# Altium PCB imprimir.PcbDoc (part 4 of 4)
Units mm, origin at the board's own origin, x right, y up, seen from the top; angles counter-clockwise.
Board outline 196.72 x 221.49 mm, 2 copper layers (Top Layer, Bottom Layer); 172 components, 0 nets, 904 pads, 232 vias.
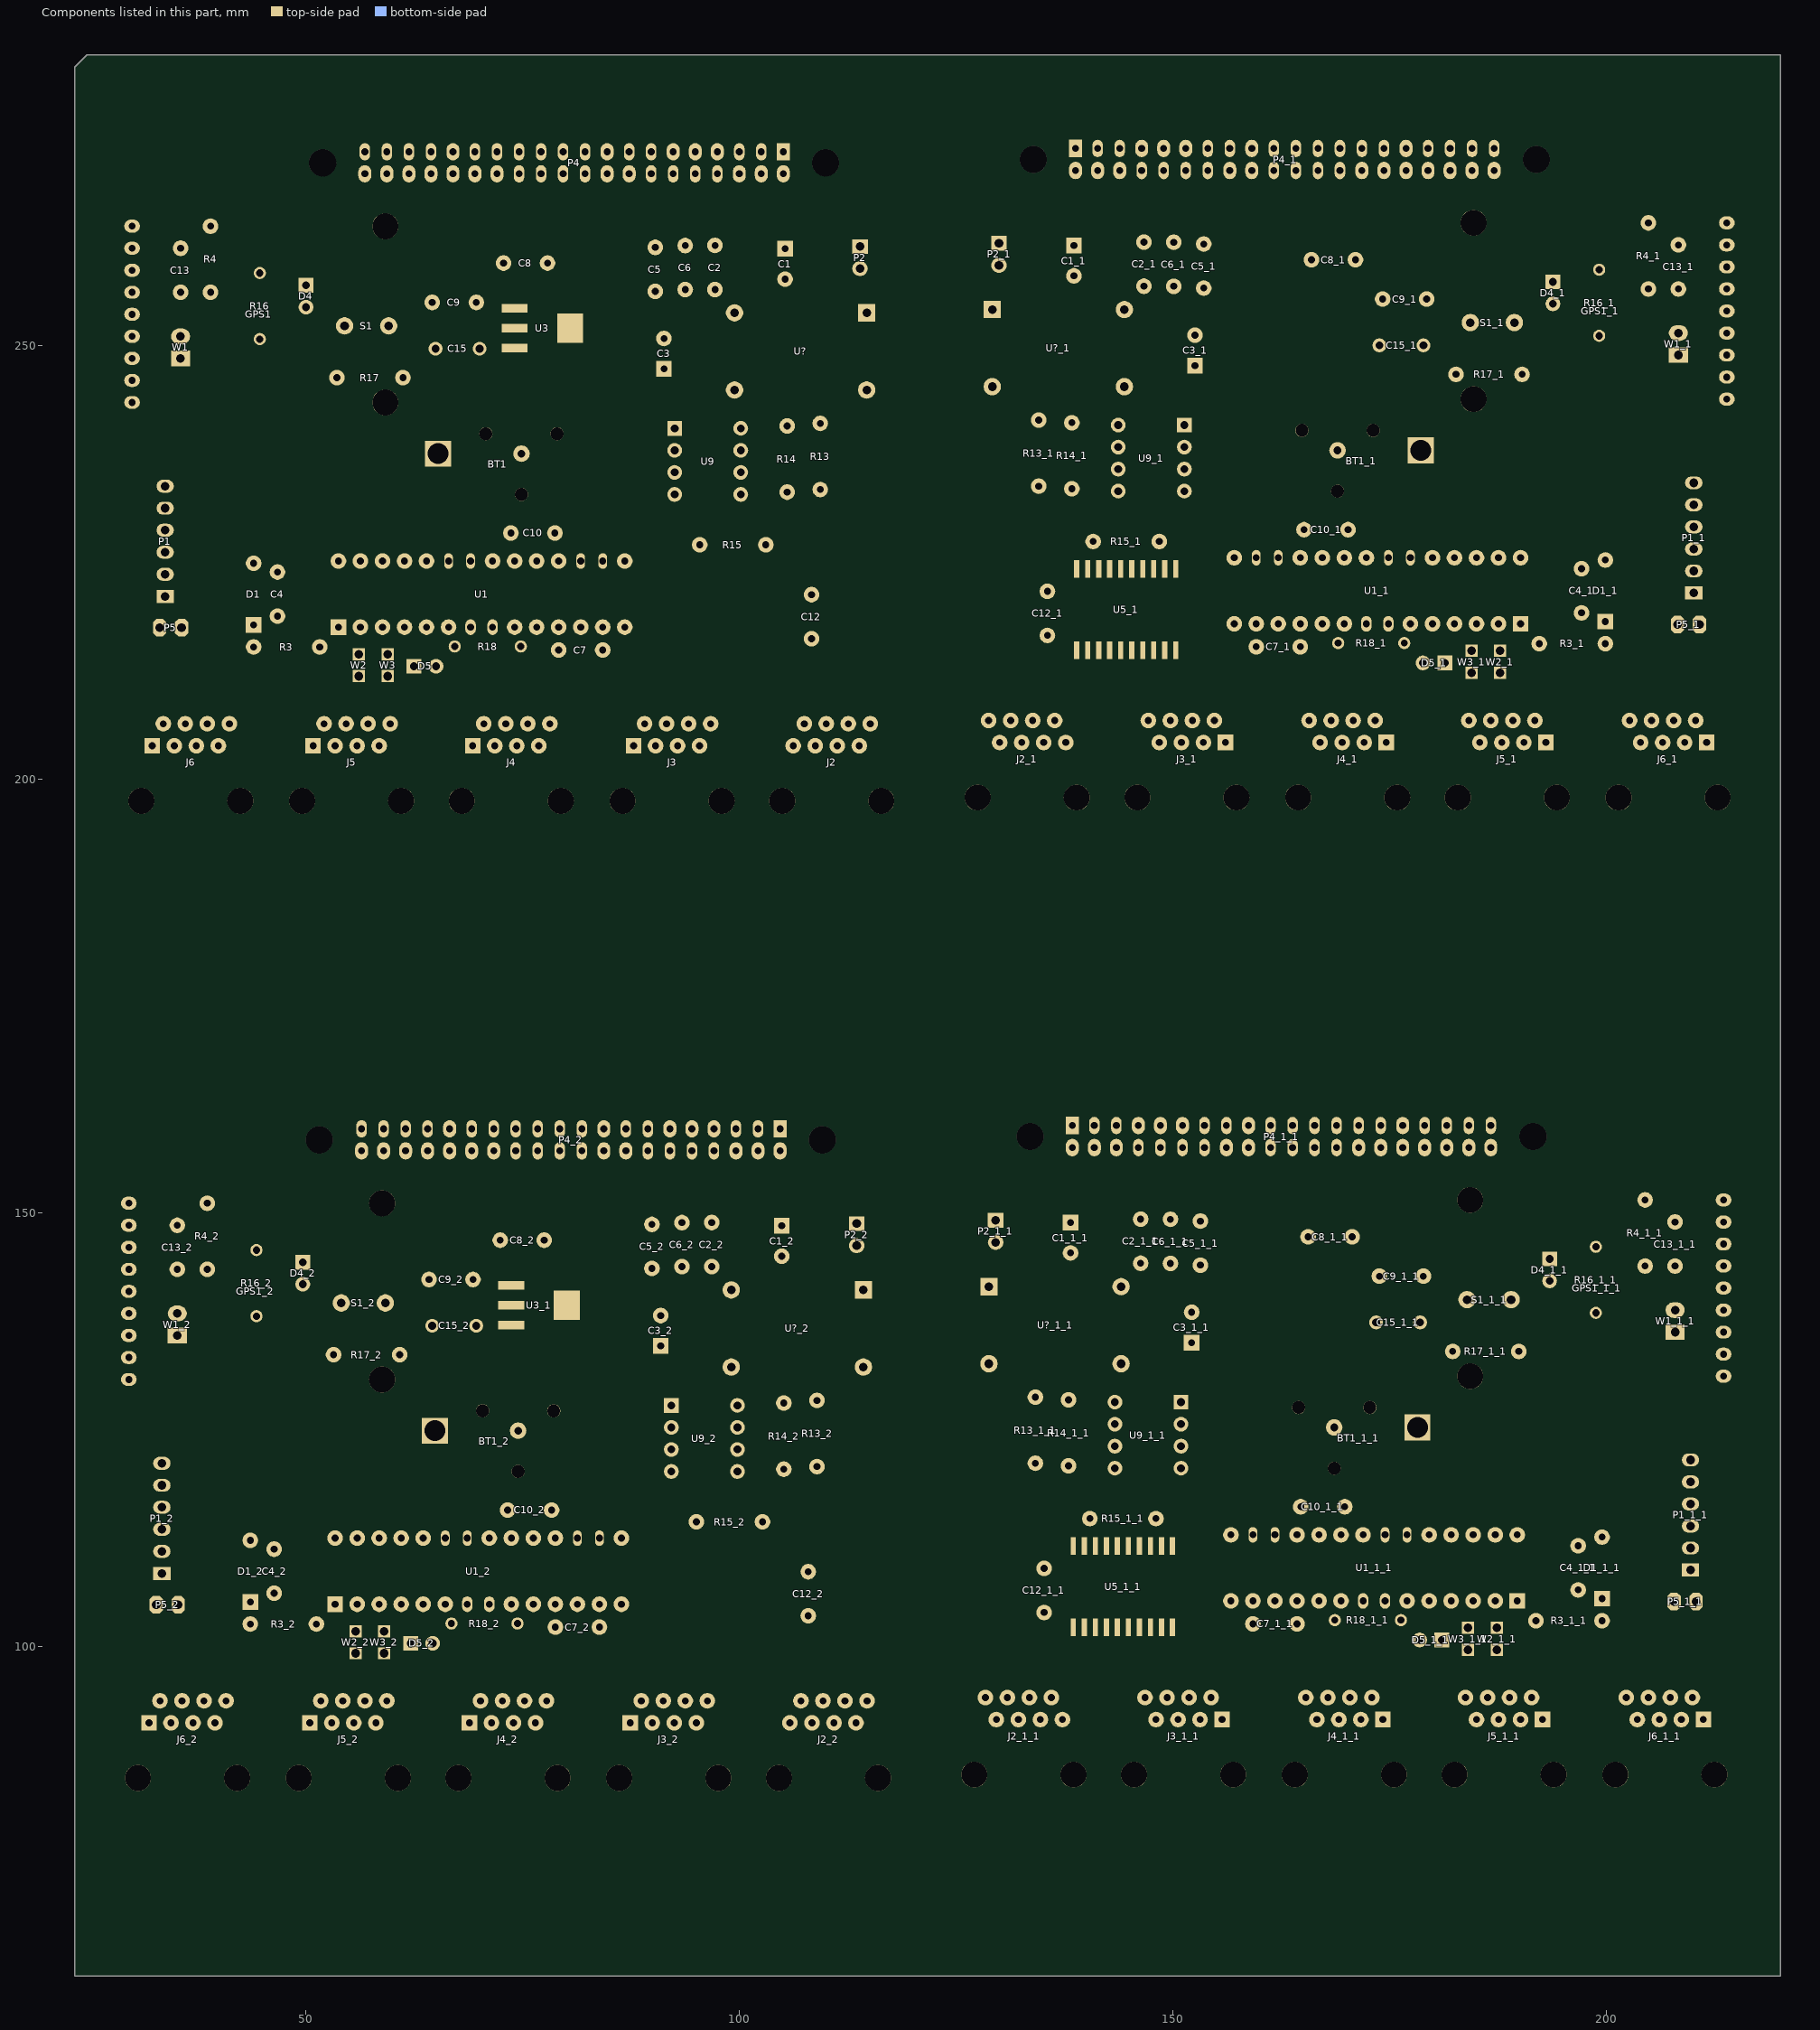
[diagram p4: the components of this part, seen from the top]

## Via types
v1: diameter 1.6, hole 0.6, Top Layer to Bottom Layer, 232 vias

## Nets (pads, with @x,y where several pads share a name; then routed paths per layer and width w, separated by ;. In a path a pad name is that pad's centre, name@x,y a point inside that pad or via, vN(x,y) a via of type N, cw(c..) or ccw(c..) an arc to the next point about the centre after c; other vN are vias at no path point) (continued)
copper on no net: (continued)
  Top Layer w0.025: 105.41,220.167 105.461,220.167
  Top Layer w0.254: 23.368,61.976 23.368,282.067 24.765,283.464 220.091,283.464 220.091,61.976 23.368,61.976
  Top Layer w0.5: 69.088,162.433 70.429,161.092 70.429,158.398 69.14,157.109 ; 69.469,275.082 70.81,273.741 70.81,271.047 69.521,269.758 ; 76.76,159.649 75.47,158.359 75.47,155.726 75.068,155.324 75.068,154.089 78.675,150.483 v1(84.72,150.483) ; 77.141,272.298 75.851,271.008 75.851,268.375 75.449,267.973 75.449,266.738 79.056,263.132 v1(85.101,263.132) ; 79.3,159.649 78.05,158.399 78.05,155.705 78.624,155.131 78.624,154.115 80.529,152.21 v1(82.739,152.21) ; 79.681,272.298 78.431,271.048 78.431,268.354 79.005,267.78 79.005,266.764 80.91,264.859 v1(83.12,264.859) ; v1@80.55,154.75 80.55,158.359 81.84,159.649 ; v1@80.931,267.399 80.931,271.008 82.221,272.298 ; 92,159.649 93.254,158.394 v1(93.254,154.75) ; 92.381,272.298 93.635,271.043 v1(93.635,267.399) ; 94.54,159.649 95.83,158.359 95.83,155.705 ; 94.921,272.298 96.211,271.008 96.211,268.354 ; 173.217,103.596 173.217,109.057 ; 173.598,216.245 173.598,221.706
  Top Layer w0.6: 35.814,105.156 v1@35.814,121.793 ; 36.195,217.805 v1@36.195,234.442 ; v1@38.481,115.57 v1(38.735,115.57) 38.735,102.87 29.718,93.853 29.718,90.551 31.623,88.646 v1(45.593,88.646) ; v1@38.862,228.219 v1(39.116,228.219) 39.116,215.519 30.099,206.502 30.099,203.2 32.004,201.295 v1(45.974,201.295) ; v1(38.989,121.793) 37.211,120.015 37.211,103.886 28.718,95.393 28.718,90.137 31.709,87.146 62.508,87.146 v1(64.135,88.773) ; v1(39.37,234.442) 37.592,232.664 37.592,216.535 29.099,208.042 29.099,202.786 32.09,199.795 62.889,199.795 v1(64.516,201.422) ; v1(45.466,92.837) 45.466,95.289 46.189,96.012 61.976,96.012 64.135,93.853 v1(64.135,92.583) 66.929,95.377 81.637,95.377 82.677,94.337 v1@82.677,93.345 ; v1(45.847,205.486) 45.847,207.938 46.57,208.661 62.357,208.661 64.516,206.502 v1(64.516,205.232) 67.31,208.026 82.018,208.026 83.058,206.986 v1@83.058,205.994 ; 52.387,112.459 53.392,112.459 ; 52.768,225.108 53.773,225.108 ; v1@53.213,148.717 53.213,148.971 56.44,152.198 56.44,157.109 ; v1@53.594,261.366 53.594,261.62 56.821,264.847 56.821,269.758 ; 54.102,139.573 54.102,145.034 v1(57.531,148.463) ; 54.483,252.222 54.483,257.683 v1(57.912,261.112) ; 56.44,159.649 56.44,160.707 58.166,162.433 73.481,162.433 v1(74.306,161.608) 75.131,162.433 93.472,162.433 94.54,161.365 94.54,159.649 ; 56.821,272.298 56.821,273.356 58.547,275.082 73.862,275.082 v1(74.687,274.257) 75.512,275.082 93.853,275.082 94.921,274.014 94.921,272.298 ; 58.98,157.109 59.055,157.034 v1(59.055,154.305) ; 59.361,269.758 59.436,269.683 v1(59.436,266.954) ; v1(59.989,120.363) 59.989,127.426 63.5,130.937 80.645,130.937 84.107,127.475 v1(88.818,127.475) ; v1(60.37,233.012) 60.37,240.075 63.881,243.586 81.026,243.586 84.488,240.124 v1(89.199,240.124) ; 61.52,157.109 61.52,155.904 65.278,152.146 v1(65.278,148.336) v1@65.278,147.828 ; 61.901,269.758 61.901,268.553 65.659,264.795 v1(65.659,260.985) v1@65.659,260.477 ; 64.06,155.65 64.06,157.109 ; 64.441,268.299 64.441,269.758 ; v1(65.102,120.956) 65.102,116.793 67.351,114.544 67.351,111.643 72.195,106.799 89.908,106.799 v1(89.789,106.68) ; v1(65.483,233.605) 65.483,229.442 67.732,227.193 67.732,224.292 72.576,219.448 90.289,219.448 v1(90.17,219.329) ; v1(66.802,99.187) 66.802,102.616 ; v1(67.183,211.836) 67.183,215.265 ; v1(68.879,115.791) 70.944,117.856 79.375,117.856 82.931,114.3 v1(89.789,114.3) ; 69.14,157.109 72.429,153.82 72.429,146.811 69.294,143.676 69.294,142.278 ; v1(69.26,228.44) 71.325,230.505 79.756,230.505 83.312,226.949 v1(90.17,226.949) ; 69.521,269.758 72.81,266.469 72.81,259.46 69.675,256.325 69.675,254.927 ; 69.668,136.944 69.294,137.319 69.294,142.278 ; 70.049,249.593 69.675,249.968 69.675,254.927 ; 73.712,137.018 76.747,133.983 83.566,133.983 ; 73.712,139.318 80.112,139.318 80.518,139.724 80.518,143.801 77.509,146.811 ; 73.712,141.618 69.954,141.618 69.294,142.278 ; 74.093,249.667 77.128,246.632 83.947,246.632 ; 74.093,251.967 80.493,251.967 80.899,252.373 80.899,256.45 77.89,259.46 ; 74.093,254.267 70.335,254.267 69.675,254.927 ; v1(76.327,102.616) 76.327,99.695 73.66,97.028 45.72,97.028 43.053,94.361 43.053,91.948 44.323,90.678 46.482,90.678 48.768,88.392 60.96,88.392 62.865,90.297 64.897,90.297 67.183,88.011 81.026,88.011 v1(82.677,89.662) ; v1(76.708,215.265) 76.708,212.344 74.041,209.677 46.101,209.677 43.434,207.01 43.434,204.597 44.704,203.327 46.863,203.327 49.149,201.041 61.341,201.041 63.246,202.946 65.278,202.946 67.564,200.66 81.407,200.66 v1(83.058,202.311) ; 78.919,102.197 78.792,102.197 82.945,98.044 104.013,98.044 107.478,101.509 107.478,103.937 ; 79.3,214.846 79.173,214.846 83.326,210.693 104.394,210.693 107.859,214.158 107.859,216.586 ; v1(82.677,92.71) v1@82.677,93.345 ; v1(82.931,116.586) 89.994,116.586 v1(90.088,116.68) ; v1(83.058,205.359) v1@83.058,205.994 ; v1(83.312,229.235) 90.375,229.235 v1(90.469,229.329) ; 89.46,157.109 89.21,157.109 89.21,153.487 90.551,152.146 94.234,152.146 95.377,153.289 99.62,153.289 99.62,157.109 ; 89.841,269.758 89.591,269.758 89.591,266.136 90.932,264.795 94.615,264.795 95.758,265.938 100.001,265.938 100.001,269.758 ; 93.385,148.836 90.13,148.836 89.923,148.629 85.598,144.304 85.598,136.015 83.566,133.983 ; 93.766,261.485 90.511,261.485 90.304,261.278 85.979,256.953 85.979,248.664 83.947,246.632 ; v1(100.838,80.391) 101.092,80.645 v1(101.092,88.773) ; v1(101.092,91.44) 105.156,87.376 115.697,87.376 116.84,88.519 116.84,117.856 106.668,128.028 105.134,128.028 ; v1(101.092,93.853) v1@101.346,94.107 ; v1(101.219,193.04) 101.473,193.294 v1(101.473,201.422) ; v1(101.473,204.089) 105.537,200.025 116.078,200.025 117.221,201.168 117.221,230.505 107.049,240.677 105.515,240.677 ; v1(101.473,206.502) v1@101.727,206.756 ; v1(101.854,154.051) 104.7,156.897 104.7,157.109 ; v1@102.108,154.305 114.675,154.305 117.094,151.886 117.094,129.921 115.503,128.33 108.959,128.33 ; v1(102.235,127.889) 102.235,129.54 101.346,130.429 90.297,130.429 86.743,133.983 83.566,133.983 ; v1(102.235,266.7) 105.081,269.546 105.081,269.758 ; v1@102.489,266.954 115.056,266.954 117.475,264.535 117.475,242.57 115.884,240.979 109.34,240.979 ; v1(102.616,240.538) 102.616,242.189 101.727,243.078 90.678,243.078 87.124,246.632 83.947,246.632 ; v1@104.542,122.936 v1(105.156,122.936) 106.733,122.936 108.959,120.71 ; v1@104.923,235.585 v1(105.537,235.585) 107.114,235.585 109.34,233.359 ; 105.134,120.408 105.41,120.132 105.41,118.771 113.919,110.262 v1(113.919,109.347) ; 105.515,233.057 105.791,232.781 105.791,231.42 114.3,222.911 v1(114.3,221.996) ; v1@111.315,109.314 v1(111.424,109.314) ; v1@111.696,221.963 v1(111.805,221.963) ; v1(112.141,96.139) 103.124,96.139 101.346,94.361 v1@101.346,94.107 ; v1(112.522,208.788) 103.505,208.788 101.727,207.01 v1@101.727,206.756 ; 128.79,132.566 132.994,136.77 132.994,145.159 ; 129.171,245.215 133.375,249.419 133.375,257.808 ; 129.438,108.839 129.438,101.346 133.454,97.33 133.454,94.083 134.724,92.813 134.724,91.543 134.724,89.837 135.407,89.154 137.82,89.154 139.471,90.805 139.471,94.615 141.884,97.028 150.774,97.028 151.869,95.933 151.869,94.083 153.139,92.813 153.139,91.543 153.139,90.615 153.965,89.789 156.715,89.789 157.886,90.961 157.886,94.996 159.791,96.901 168.173,96.901 170.411,94.663 170.411,94.083 170.411,93.953 171.681,92.683 171.681,91.543 171.681,90.853 173.126,89.408 175.158,89.408 176.301,90.551 176.301,93.98 179.349,97.028 186.207,97.028 188.826,94.409 188.826,94.083 189.053,94.083 190.096,93.04 190.096,91.543 190.096,90.648 191.12,89.624 194.127,89.624 195.245,90.742 195.245,95.438 196.962,97.155 204.891,97.155 207.368,94.678 207.368,94.083 207.497,93.954 207.497,92.684 208.638,91.543 ; 129.438,146.05 130.2,146.05 131.091,145.159 145.276,145.159 146.286,144.149 146.298,144.137 149.719,144.137 152.973,144.137 153.18,143.93 152.171,142.922 152.171,138.501 149.965,138.501 144.03,132.566 ; 129.565,149.098 146.155,149.098 ; 129.644,91.543 129.644,86.027 133.248,82.423 205.003,82.423 213.131,90.551 213.131,94.107 207.543,99.695 188.112,99.695 187.604,99.187 ; 129.819,221.488 129.819,213.995 133.835,209.979 133.835,206.732 135.105,205.462 135.105,204.192 135.105,202.486 135.788,201.803 138.201,201.803 139.852,203.454 139.852,207.264 142.265,209.677 151.155,209.677 152.25,208.582 152.25,206.732 153.52,205.462 153.52,204.192 153.52,203.264 154.346,202.438 157.096,202.438 158.267,203.61 158.267,207.645 160.172,209.55 168.554,209.55 170.792,207.312 170.792,206.732 170.792,206.602 172.062,205.332 172.062,204.192 172.062,203.502 173.507,202.057 175.539,202.057 176.682,203.2 176.682,206.629 179.73,209.677 186.588,209.677 189.207,207.058 189.207,206.732 189.434,206.732 190.477,205.689 190.477,204.192 190.477,203.297 191.501,202.273 194.508,202.273 195.626,203.391 195.626,208.087 197.343,209.804 205.272,209.804 207.749,207.327 207.749,206.732 207.878,206.603 207.878,205.333 209.019,204.192 ; 129.819,258.699 130.581,258.699 131.472,257.808 145.657,257.808 146.667,256.798 146.679,256.786 150.1,256.786 153.354,256.786 153.561,256.579 152.552,255.571 152.552,251.15 150.346,251.15 144.411,245.215 ; 129.946,261.747 146.536,261.747 ; 130.025,204.192 130.025,198.676 133.629,195.072 205.384,195.072 213.512,203.2 213.512,206.756 207.924,212.344 188.493,212.344 187.985,211.836 ; 130.914,94.083 130.914,96.472 v1(130.962,96.52) 130.962,97.028 127.684,100.306 127.684,114.631 134.144,121.091 ; 131.295,206.732 131.295,209.121 v1(131.343,209.169) 131.343,209.677 128.065,212.955 128.065,227.28 134.525,233.74 ; v1@131.968,109.307 131.64,108.98 131.64,104.531 136.878,99.293 145.04,99.293 146.141,100.394 146.141,102.172 ; v1@132.349,221.956 132.021,221.629 132.021,217.18 137.259,211.942 145.421,211.942 146.522,213.043 146.522,214.821 ; 132.359,91.368 132.359,89.154 133.883,87.63 148.234,87.63 150.599,89.995 150.599,90.437 ; 132.74,204.017 132.74,201.803 134.264,200.279 148.615,200.279 150.98,202.644 150.98,203.086 ; 133.441,106.503 135.625,104.318 142.318,104.318 143.601,103.035 143.601,102.172 142.331,102.172 141.061,102.172 139.791,102.172 138.521,102.172 ; 133.441,106.579 133.441,113.349 136.931,116.84 141.757,116.84 142.265,116.332 142.265,115.189 ; 133.822,219.152 136.006,216.967 142.699,216.967 143.982,215.684 143.982,214.821 142.712,214.821 141.442,214.821 140.172,214.821 138.902,214.821 ; 133.822,219.228 133.822,225.998 137.312,229.489 142.138,229.489 142.646,228.981 142.646,227.838 ; v1@135.994,97.536 135.994,96.091 ; v1@136.375,210.185 136.375,208.74 ; 137.264,91.543 137.264,92.813 135.994,94.083 135.994,96.091 ; 137.645,204.192 137.645,205.462 136.375,206.732 136.375,208.74 ; 137.892,87.812 141.902,91.821 v1(142.011,91.821) ; v1(137.947,123.317) 143.062,123.317 143.318,123.061 ; 137.969,120.789 143.051,120.789 143.318,120.521 142.331,119.534 142.331,111.544 141.061,111.544 139.791,111.544 138.521,111.544 ; 137.969,128.409 140.777,125.601 143.318,125.601 ; 138.273,200.461 142.283,204.47 v1(142.392,204.47) ; v1(138.328,235.966) 143.443,235.966 143.699,235.71 ; 138.35,233.438 143.432,233.438 143.699,233.17 142.712,232.183 142.712,224.193 141.442,224.193 140.172,224.193 138.902,224.193 ; 138.35,241.058 141.158,238.25 143.699,238.25 ; 140.426,114.715 137.521,114.715 135.849,113.043 135.849,109.622 135.625,109.398 144.884,109.398 146.141,110.655 146.141,111.544 ; 140.807,227.364 137.902,227.364 136.23,225.692 136.23,222.271 136.006,222.047 145.265,222.047 146.522,223.304 146.522,224.193 ; v1@140.995,154.686 v1(141.249,154.432) ; v1@141.376,267.335 v1(141.63,267.081) ; v1@141.63,154.559 146.456,154.559 149.719,151.297 149.719,149.217 ; v1@141.884,94.615 143.297,96.028 148.599,96.028 149.329,95.298 149.329,94.083 ; v1@142.011,81.28 142.519,80.772 204.774,80.772 214.131,90.129 214.131,95.283 208.577,100.838 191.16,100.838 187.172,104.827 187.172,105.189 187.187,105.204 187.172,105.22 ; v1(142.011,89.154) 145.67,89.154 148.059,91.543 ; v1@142.011,267.208 146.837,267.208 150.1,263.946 150.1,261.866 ; v1@142.265,207.264 143.678,208.677 148.98,208.677 149.71,207.947 149.71,206.732 ; v1@142.392,193.929 142.9,193.421 205.155,193.421 214.512,202.778 214.512,207.932 208.958,213.487 191.541,213.487 187.553,217.476 187.553,217.838 187.568,217.853 187.553,217.869 ; v1(142.392,201.803) 146.051,201.803 148.44,204.192 ; 142.89,104.204 148.681,109.995 148.681,111.544 ; 143.271,216.853 149.062,222.644 149.062,224.193 ; 144.03,141.456 140.868,138.294 v1(140.868,128.27) 140.997,128.141 143.318,128.141 145.82,128.141 151.79,134.112 151.79,134.62 ; 144.411,254.105 141.249,250.943 v1(141.249,240.919) 141.378,240.79 143.699,240.79 146.201,240.79 152.171,246.761 152.171,247.269 ; 144.871,102.172 144.871,103.138 148.794,107.061 v1(153.314,107.061) ; 144.871,111.544 144.871,113.602 145.951,114.682 148.035,114.682 ; 145.252,214.821 145.252,215.787 149.175,219.71 v1(153.695,219.71) ; 145.252,224.193 145.252,226.251 146.332,227.331 148.416,227.331 ; 147.411,102.172 147.411,103.696 148.935,105.22 148.954,105.201 154.347,105.201 156.673,105.201 156.692,105.22 ; 147.792,214.821 147.792,216.345 149.316,217.869 149.335,217.85 154.728,217.85 157.054,217.85 157.073,217.869 ; 148.681,102.172 148.681,100.165 149.649,99.197 170.469,99.197 172.745,101.473 176.936,101.473 179.349,103.886 179.349,104.748 179.552,104.95 179.552,105.22 ; 149.062,214.821 149.062,212.814 150.03,211.846 170.85,211.846 173.126,214.122 177.317,214.122 179.73,216.535 179.73,217.397 179.933,217.599 179.933,217.869 ; v1(149.849,155.131) 149.996,155.131 153.962,151.165 155.793,151.165 156.686,150.272 156.686,148.441 156.686,115.783 155.188,114.285 154.939,114.285 154.939,110.122 157.756,107.305 160.417,107.305 160.466,107.353 160.619,107.353 161.772,106.201 161.772,105.22 ; 149.951,111.544 149.951,114.161 150.715,114.925 v1(151.094,114.546) ; v1(150.23,267.78) 150.377,267.78 154.343,263.814 156.174,263.814 157.067,262.921 157.067,261.09 157.067,228.432 155.569,226.934 155.32,226.934 155.32,222.771 158.137,219.954 160.798,219.954 160.847,220.002 161,220.002 162.153,218.85 162.153,217.869 ; 150.332,224.193 150.332,226.81 151.096,227.574 v1(151.475,227.195) ; 150.599,91.543 150.599,90.437 ; 150.938,120.521 150.938,119.343 v1@153.187,117.094 ; 150.938,125.601 150.938,123.061 151.919,123.061 154.584,120.396 154.584,115.951 v1(153.314,114.681) ; 150.938,128.141 v1@154.202,128.141 ; 150.98,204.192 150.98,203.086 ; 151.319,233.17 151.319,231.992 v1@153.568,229.743 ; 151.319,238.25 151.319,235.71 152.3,235.71 154.965,233.045 154.965,228.6 v1(153.695,227.33) ; 151.319,240.79 v1@154.583,240.79 ; 155.679,91.543 155.679,92.908 154.504,94.083 154.409,94.083 154.409,96.568 ; 156.06,204.192 156.06,205.557 154.885,206.732 154.79,206.732 154.79,209.217 ; 156.91,113.059 156.692,112.84 159.765,109.767 v1(159.765,108.88) ; 157.291,225.708 157.073,225.489 160.146,222.416 v1(160.146,221.529) ; v1(158.384,150.864) 158.384,114.313 159.232,113.465 159.232,112.84 ; v1(158.765,263.513) 158.765,226.962 159.613,226.114 159.613,225.489 ; 159.232,102.426 159.232,102.578 ; 159.232,105.22 159.232,102.578 ; 159.613,215.075 159.613,215.227 ; 159.613,217.869 159.613,215.227 ; v1(160.365,152.591) 161.772,151.184 161.772,113.145 161.772,112.84 ; v1(160.426,90.043) 161.927,91.543 166.601,91.543 ; v1(160.426,93.091) 160.426,94.591 161.593,95.758 166.196,95.758 167.871,94.083 ; v1@160.553,116.967 160.553,111.252 164.312,107.494 164.312,105.22 ; v1(160.746,265.24) 162.153,263.833 162.153,225.794 162.153,225.489 ; v1(160.807,202.692) 162.308,204.192 166.982,204.192 ; v1(160.807,205.74) 160.807,207.24 161.974,208.407 166.577,208.407 168.252,206.732 ; v1@160.934,229.616 160.934,223.901 164.693,220.143 164.693,217.869 ; v1(162.575,155.131) 162.922,154.784 162.922,114.55 164.312,113.16 164.312,112.84 ; v1(162.956,267.78) 163.303,267.433 163.303,227.199 164.693,225.809 164.693,225.489 ; 164.312,102.578 165.468,101.422 167.487,101.422 169.316,103.251 171.221,103.251 171.932,103.961 171.932,105.22 171.932,107.784 166.876,112.84 166.852,112.84 166.852,113.475 164.312,116.015 164.312,121.119 168.408,125.215 168.408,128.759 173.435,133.786 173.435,137.325 176.776,133.985 182.27,133.985 ; 164.693,215.227 165.849,214.071 167.868,214.071 169.697,215.9 171.602,215.9 172.313,216.61 172.313,217.869 172.313,220.433 167.257,225.489 167.233,225.489 167.233,226.124 164.693,228.664 164.693,233.768 168.789,237.864 168.789,241.408 173.816,246.435 173.816,249.974 177.157,246.634 182.651,246.634 ; 165.595,147.192 167.88,144.907 176.682,144.907 178.89,142.7 178.89,142.659 178.515,142.285 178.515,137.325 ; 165.976,259.841 168.261,257.556 177.063,257.556 179.271,255.349 179.271,255.308 178.896,254.934 178.896,249.974 ; v1(166.344,155.131) 166.344,154.23 169.57,151.003 178.333,151.003 186.588,142.748 186.588,139.827 192.938,133.477 v1(192.938,126.492) ; v1(166.725,267.78) 166.725,266.879 169.951,263.652 178.714,263.652 186.969,255.397 186.969,252.476 193.319,246.126 v1(193.319,239.141) ; v1(166.776,102.997) 166.776,105.145 166.852,105.22 ; v1(167.143,110.345) 167.143,110.024 169.392,107.775 169.392,105.22 ; v1(167.157,215.646) 167.157,217.794 167.233,217.869 ; v1(167.524,222.994) 167.524,222.673 169.773,220.424 169.773,217.869 ; v1@168.417,162.37 v1(168.798,161.989) ; v1@168.798,275.019 v1(169.179,274.638) ; 169.141,91.543 169.141,89.944 167.716,88.519 152.517,88.519 150.599,90.437 ; 169.199,90.2 171.745,87.654 185.295,87.654 187.75,90.109 187.75,90.164 ; 169.392,112.84 169.392,116.015 ; 169.522,204.192 169.522,202.593 168.097,201.168 152.898,201.168 150.98,203.086 ; 169.58,202.849 172.126,200.303 185.676,200.303 188.131,202.758 188.131,202.813 ; 169.773,225.489 169.773,228.664 ; 171.932,112.84 171.932,123.265 176.555,127.889 180.492,127.889 184.302,124.079 202.209,124.079 v1(204.114,122.174) ; 172.313,225.489 172.313,235.914 176.936,240.538 180.873,240.538 184.683,236.728 202.59,236.728 v1(204.495,234.823) ; 173.217,103.596 169.893,100.272 163.535,100.272 161.228,102.578 159.232,102.578 ; 173.217,109.057 174.904,110.744 187.936,110.744 189.712,112.519 189.712,112.84 189.679,112.873 189.679,118.025 190.906,119.253 195.351,119.253 196.738,117.867 196.738,111.57 198.481,111.57 199.491,112.58 ; 173.598,216.245 170.274,212.921 163.916,212.921 161.609,215.227 159.613,215.227 ; 173.598,221.706 175.285,223.393 188.317,223.393 190.093,225.168 190.093,225.489 190.06,225.522 190.06,230.674 191.287,231.902 195.732,231.902 197.119,230.516 197.119,224.219 198.862,224.219 199.872,225.229 ; v1@174.142,116.205 174.472,115.876 174.472,112.84 174.386,112.926 ; 174.221,91.543 174.221,92.813 172.951,94.083 172.951,95.71 ; 174.472,105.22 174.472,106.169 176.174,107.872 v1(176.174,109.22) ; v1@174.523,228.854 174.853,228.525 174.853,225.489 174.767,225.575 ; 174.602,204.192 174.602,205.462 173.332,206.732 173.332,208.359 ; 174.853,217.869 174.853,218.818 176.555,220.521 v1(176.555,221.869) ; v1(176.301,99.568) 177.698,99.568 178.46,100.33 178.46,100.711 ; v1(176.682,212.217) 178.079,212.217 178.841,212.979 178.841,213.36 ; 177.012,105.22 177.012,106.017 179.349,108.355 v1(179.349,108.458) ; 177.012,112.84 177.012,117.55 181.889,122.428 196.113,122.428 202.59,115.951 v1(204.368,115.951) ; 177.393,217.869 177.393,218.666 179.73,221.004 v1(179.73,221.107) ; 177.393,225.489 177.393,230.199 182.27,235.077 196.494,235.077 202.971,228.6 v1(204.749,228.6) ; v1(177.825,148.717) 183.921,142.621 183.921,139.954 183.921,136.398 186.334,133.985 189.89,133.985 ; v1(178.001,121.337) 178.001,125.208 178.008,125.215 ; v1(178.206,261.366) 184.302,255.27 184.302,252.603 184.302,249.047 186.715,246.634 190.271,246.634 ; v1(178.382,233.986) 178.382,237.857 178.389,237.864 ; v1(178.968,89.154) 178.968,90.424 180.088,91.543 185.016,91.543 ; v1(178.968,92.964) 178.968,94.234 180.746,96.012 184.699,96.012 186.286,94.425 186.286,94.083 ; v1(179.349,201.803) 179.349,203.073 180.469,204.192 185.397,204.192 ; v1(179.349,205.613) 179.349,206.883 181.127,208.661 185.08,208.661 186.667,207.074 186.667,206.732 ; 179.552,112.84 179.664,112.952 v1@179.664,115.954 ; 179.933,225.489 180.045,225.601 v1@180.045,228.603 ; 181,100.711 181.889,99.822 184.048,99.822 ; 181.381,213.36 182.27,212.471 184.429,212.471 ; 182.092,105.22 182.092,106.017 183.58,107.506 187.949,107.506 192.444,112 192.43,112.014 v1(192.43,117.475) ; 182.092,112.84 v1(182.092,116.015) ; 182.473,217.869 182.473,218.666 183.961,220.155 188.33,220.155 192.825,224.649 192.811,224.663 v1(192.811,230.124) ; 182.473,225.489 v1(182.473,228.664) ; v1@183.286,120.904 184.632,119.559 184.632,112.84 184.632,112.621 ; v1@183.667,233.553 185.013,232.208 185.013,225.489 185.013,225.27 ; 184.048,102.362 187.35,102.362 ; v1@184.048,155.13 183.604,154.686 182.397,154.686 180.873,153.162 180.873,150.618 195.097,136.394 195.097,126.619 195.986,125.73 204.876,125.73 207.162,123.444 v1(207.162,122.174) ; 184.429,215.011 187.731,215.011 ; v1@184.429,267.779 183.985,267.335 182.778,267.335 181.254,265.811 181.254,263.267 195.478,249.043 195.478,239.268 196.367,238.379 205.257,238.379 207.543,236.093 v1(207.543,234.823) ; 184.632,105.22 187.356,102.495 ; 185.013,217.869 187.737,215.144 ; v1(185.572,148.844) 188.239,151.511 196.494,151.511 v1(199.161,148.844) ; v1(185.953,261.493) 188.62,264.16 196.875,264.16 v1(199.542,261.493) ; 187.172,112.84 187.172,117.554 190.344,120.726 195.505,120.726 202.326,113.905 v1(202.326,113.856) 209.692,113.856 211.089,113.856 212.486,115.253 212.486,122.312 204.459,130.338 204.459,140.373 207.914,143.828 ; 187.553,225.489 187.553,230.203 190.725,233.375 195.886,233.375 202.707,226.554 v1(202.707,226.505) 210.073,226.505 211.47,226.505 212.867,227.902 212.867,234.961 204.84,242.987 204.84,253.022 208.295,256.477 ; 187.556,91.543 187.75,91.349 187.75,90.164 ; 187.937,204.192 188.131,203.998 188.131,202.813 ; 189.712,105.22 189.712,105.093 191.871,102.934 191.871,104.798 195.849,108.776 209.692,108.776 209.692,107.453 210.337,106.807 210.337,105.156 ; 190.093,217.869 190.093,217.742 192.252,215.583 192.252,217.447 196.23,221.425 210.073,221.425 210.073,220.102 210.718,219.456 210.718,217.805 ; v1(190.144,148.844) 193.446,145.542 193.446,144.653 ; v1(190.525,261.493) 193.827,258.191 193.827,257.302 ; 192.636,91.543 192.636,92.813 191.366,94.083 ; 193.017,204.192 193.017,205.462 191.747,206.732 ; 193.446,142.113 197.129,138.43 198.78,138.43 ; 193.827,254.762 197.51,251.079 199.161,251.079 ; v1@197.764,93.345 200.304,95.885 203.026,95.885 204.828,94.083 ; v1@198.145,89.408 200.281,91.543 203.558,91.543 ; v1@198.145,205.994 200.685,208.534 203.407,208.534 205.209,206.732 ; v1@198.526,202.057 200.662,204.192 203.939,204.192 ; v1@198.77,121.984 202.389,118.364 207.723,118.364 209.692,116.396 ; v1@199.151,234.633 202.77,231.013 208.104,231.013 210.073,229.045 ; 199.491,102.934 199.491,105.48 ; 199.491,113.008 199.491,112.58 ; 199.872,215.583 199.872,218.129 ; 199.872,225.657 199.872,225.229 ; v1(201.564,122.111) 203.786,119.888 208.739,119.888 209.692,118.936 ; v1(201.945,234.76) 204.167,232.537 209.12,232.537 210.073,231.585 ; v1(202.59,138.684) 202.59,149.579 204.459,151.448 v1(211.089,151.448) v1@211.089,151.321 ; v1(202.971,251.333) 202.971,262.228 204.84,264.097 v1(211.47,264.097) v1@211.47,263.97 ; 206.098,91.543 206.098,90.359 203.266,87.527 190.387,87.527 187.75,90.164 ; 206.479,204.192 206.479,203.008 203.647,200.176 190.768,200.176 188.131,202.813 ; v1(211.089,148.908) v1(211.089,133.668) 211.089,126.556 214.01,123.635 214.01,114.237 211.089,111.316 200.755,111.316 199.491,112.58 ; 211.178,91.543 209.908,92.813 209.908,94.083 209.908,94.779 206.135,98.552 195.835,98.552 191.366,94.083 ; v1(211.47,261.557) v1(211.47,246.317) 211.47,239.205 214.391,236.284 214.391,226.886 211.47,223.965 201.136,223.965 199.872,225.229 ; 211.559,204.192 210.289,205.462 210.289,206.732 210.289,207.428 206.516,211.201 196.216,211.201 191.747,206.732 ; v1@82.677,93.345 85.217,95.885 99.568,95.885 v1@101.346,94.107 ; v1@83.058,205.994 85.598,208.534 99.949,208.534 v1@101.727,206.756 ; 135.994,96.091 137.947,98.044 152.933,98.044 154.409,96.568 ; 136.375,208.74 138.328,210.693 153.314,210.693 154.79,209.217 ; 154.409,96.568 154.409,96.853 155.6,98.044 170.967,98.044 172.951,96.06 172.951,95.71 ; 154.79,209.217 154.79,209.502 155.981,210.693 171.348,210.693 173.332,208.709 173.332,208.359 ; 172.951,95.71 175.269,98.028 188.636,98.028 191.366,95.298 191.366,94.083 ; 173.332,208.359 175.65,210.677 189.017,210.677 191.747,207.947 191.747,206.732
  Top Layer w0.75: 29.602,133.287 v1(32.015,133.287) ; 29.602,140.907 30.237,140.907 32.777,138.367 35.19,138.367 ; 29.602,143.447 31.38,143.447 33.92,140.907 36.638,140.907 38.354,139.191 38.354,127.71 v1(44.334,121.73) 44.02,121.416 44.02,118.413 52.578,109.855 66.04,109.855 67.056,108.839 v1(66.929,108.839) ; 29.602,145.987 32.65,145.987 35.19,143.447 38.644,143.447 42.101,143.447 54.229,155.575 54.229,158.877 55.001,159.649 56.44,159.649 ; 29.602,148.527 v1(32.015,148.527) 35.19,148.527 v1@43.942,148.527 ; 29.602,151.067 v1(32.015,151.067) ; 29.983,245.936 v1(32.396,245.936) ; 29.983,253.556 30.618,253.556 33.158,251.016 35.571,251.016 ; 29.983,256.096 31.761,256.096 34.301,253.556 37.019,253.556 38.735,251.84 38.735,240.359 v1(44.715,234.379) 44.401,234.065 44.401,231.062 52.959,222.504 66.421,222.504 67.437,221.488 v1(67.31,221.488) ; 29.983,258.636 33.031,258.636 35.571,256.096 39.025,256.096 42.482,256.096 54.61,268.224 54.61,271.526 55.382,272.298 56.821,272.298 ; 29.983,261.176 v1(32.396,261.176) 35.571,261.176 v1@44.323,261.176 ; 29.983,263.716 v1(32.396,263.716) ; 35.19,135.827 35.19,128.08 v1(41.54,121.73) 41.54,118.809 52.272,108.077 v1(63.754,108.077) ; 35.571,248.476 35.571,240.729 v1(41.921,234.379) 41.921,231.458 52.653,220.726 v1(64.135,220.726) ; v1(40.778,113.475) 40.778,111.697 46.366,106.109 ; v1@40.801,137.702 55.88,122.623 55.88,119.126 59.372,115.634 v1(61.012,115.634) ; v1(41.159,226.124) 41.159,224.346 46.747,218.758 ; v1@41.182,250.351 56.261,235.272 56.261,231.775 59.753,228.283 v1(61.393,228.283) ; v1(50.673,117.094) 50.673,120.58 50.673,124.841 50.673,125.222 ; v1(51.054,229.743) 51.054,233.229 51.054,237.49 51.054,237.871 ; v1@57.531,148.59 61.976,148.59 64.214,146.352 64.214,142.405 ; v1@57.912,261.239 62.357,261.239 64.595,259.001 64.595,255.054 ; v1@63.422,115.59 v1@63.44,115.573 ; v1(63.552,115.634) 62.103,117.083 62.103,127.008 64.588,129.493 79.876,129.493 82.816,126.553 ; v1@63.803,228.239 v1@63.821,228.222 ; v1(63.933,228.283) 62.484,229.732 62.484,239.657 64.969,242.142 80.257,242.142 83.197,239.202 ; 64.06,155.65 64.833,154.877 68.009,154.877 69.14,156.008 ; 64.441,268.299 65.214,267.526 68.39,267.526 69.521,268.657 ; 74.22,159.649 74.22,161.522 v1(74.306,161.608) ; 74.601,272.298 74.601,274.171 v1(74.687,274.257) ; v1(75.96,109.964) 76.242,110.246 88.148,110.246 91.443,113.541 v1@91.443,113.926 ; v1(76.341,222.613) 76.623,222.895 88.529,222.895 91.824,226.19 v1@91.824,226.575 ; v1(76.76,154.75) 76.76,157.109 ; v1(77.141,267.399) 77.141,269.758 ; 81.84,157.109 81.84,155.777 83.82,153.797 86.868,153.797 89.21,156.139 ; 82.221,269.758 82.221,268.426 84.201,266.446 87.249,266.446 89.591,268.788 ; 82.816,126.553 95.068,114.301 ; 83.197,239.202 95.449,226.95 ; v1@83.338,108.386 88.32,108.386 92.202,112.268 108.361,112.268 v1@111.315,109.314 ; v1@83.719,221.035 88.701,221.035 92.583,224.917 108.742,224.917 v1@111.696,221.963 ; 83.872,102.197 86.247,99.822 101.727,99.822 108.077,106.172 108.077,108.418 107.478,109.017 ; 84.253,214.846 86.628,212.471 102.108,212.471 108.458,218.821 108.458,221.067 107.859,221.666 ; 95.83,155.705 98.081,153.453 ; 96.211,268.354 98.462,266.102 ; 96.817,143.768 96.817,145.712 99.695,148.59 99.695,155.509 99.62,157.109 ; 97.198,256.417 97.198,258.361 100.076,261.239 100.076,268.158 100.001,269.758
  Top Layer w0.8: v1(107.394,97.711) 109.25,99.568 113.538,99.568 114.935,98.171 v1(114.935,96.266) ; v1(107.775,210.36) 109.631,212.217 113.919,212.217 115.316,210.82 v1(115.316,208.915) ; v1@127.914,96.901 125.501,99.314 125.501,138.167 128.79,141.456 126.136,144.11 126.136,148.336 126.898,149.098 129.565,149.098 ; v1@128.295,209.55 125.882,211.963 125.882,250.816 129.171,254.105 126.517,256.759 126.517,260.985 127.279,261.747 129.946,261.747
  Top Layer w1: 102.16,157.109 104.7,157.109 ; 102.541,269.758 105.081,269.758
  other v1: 142.265,80.772 197.51,89.027 197.637,93.218 142.011,94.234 128.168,96.647 135.71,98.092 83.338,108.499 131.679,109.695 129.184,109.728 92.009,114.165 179.552,116.015 174.224,116.172 160.172,116.967 153.015,117.061 183.114,120.744 35.941,121.793 198.77,122.111 50.165,126.111 154.285,127.856 40.513,138.303 43.942,148.463 52.959,148.463 184.048,154.686 80.529,154.75 142.646,193.421 197.891,201.676 198.018,205.867 142.392,206.883 128.549,209.296 136.091,210.741 83.719,221.148 132.06,222.344 129.565,222.377 92.39,226.814 179.933,228.664 174.605,228.821 160.553,229.616 153.396,229.71 183.495,233.393 36.322,234.442 199.151,234.76 50.546,238.76 154.666,240.505 40.894,250.952 44.323,261.112 53.34,261.112 184.429,267.335 80.91,267.399

## Polygon pours and split planes (outlines as drawn)
no net on Top Layer "Top Layer" (solid, pour order 32): 46.99,162.814 48.387,164.211 48.514,164.211 106.68,164.211 118.745,152.146 118.745,78.232 118.618,78.105 117.221,76.708 29.718,76.708 27.94,78.486 27.94,78.74 27.94,152.781 27.813,152.908 28.575,153.67 28.575,153.924 47.244,153.924 47.117,154.051 47.117,162.687
no net on Top Layer "Bottom Layer" (solid, pour order 30): 195.859,163.195 195.859,163.322 194.589,164.592 136.55,164.592 136.169,164.592 124.358,152.781 124.485,152.654 124.485,78.486 124.739,78.486 126.009,77.216 126.136,77.089 213.004,77.089 213.766,77.089 215.417,78.74 215.29,78.867 215.29,153.543 214.401,154.432 195.986,154.432 195.986,163.068 196.24,163.322
no net on Top Layer "Bottom Layer" (solid, pour order 28): 196.24,275.844 196.24,275.971 194.97,277.241 136.931,277.241 136.55,277.241 124.739,265.43 124.866,265.303 124.866,191.135 125.12,191.135 126.39,189.865 126.517,189.738 213.385,189.738 214.147,189.738 215.798,191.389 215.671,191.516 215.671,266.192 214.782,267.081 196.367,267.081 196.367,275.717 196.621,275.971
no net on Top Layer "Top Layer" (solid, pour order 22): 47.371,275.463 48.768,276.86 48.895,276.86 107.061,276.86 119.126,264.795 119.126,190.881 118.999,190.754 117.602,189.357 30.099,189.357 28.321,191.135 28.321,191.389 28.321,265.43 28.194,265.557 28.956,266.319 28.956,266.573 47.625,266.573 47.498,266.7 47.498,275.336

## Keep-outs
Keep-Out Layer:
  region: 217.17,165.481 122.883,165.481 122.883,75.311 217.17,75.311
  rectangle: 25.654,75.565 120.015,165.608
  rectangle: 26.035,188.214 120.396,278.257
  region: 217.551,278.13 123.264,278.13 123.264,187.96 217.551,187.96

## Other copper
Top Layer:
  text "R-013" at 49.846,268.543 h3 r90
  text "FUE+" at 109.728,264.16 h1.5
  text "Acelerografo V1.4" at 31.115,212.471 h3.7 r90
  text "R-013" at 49.465,155.894 h3 r90
  text "FUE+" at 109.347,151.511 h1.5
  text "Acelerografo V1.4" at 30.734,99.822 h3.7 r90

## Silkscreen, mask and mechanical layers (free items; w line width, h text height)
Mechanical 7:
  lines w0.5: 55.22,160.879 55.22,155.879 105.92,155.879 105.92,160.879 ; 55.601,273.528 55.601,268.528 106.301,268.528 106.301,273.528 ; 137.184,161.26 137.184,156.26 187.884,156.26 187.884,161.26 ; 137.565,273.909 137.565,268.909 188.265,268.909 188.265,273.909 ; 27.57,78.475 29.591,76.454 117.475,76.454 118.999,77.978 118.999,133.096 118.999,152.4 106.934,164.465 48.514,164.465 46.87,162.821 46.87,154.129 28.61,154.129 27.57,153.089 27.57,78.475 ; 27.951,191.124 27.951,265.738 28.991,266.778 47.251,266.778 47.251,275.47 48.895,277.114 107.315,277.114 119.38,265.049 119.38,245.745 119.38,190.627 117.856,189.103 29.972,189.103 27.951,191.124 ; 124.104,78.359 124.104,133.477 124.104,152.781 136.169,164.846 194.589,164.846 196.234,163.202 196.234,154.51 214.494,154.51 215.534,153.47 215.534,78.856 213.512,76.835 125.628,76.835 124.104,78.359 ; 124.485,191.008 126.009,189.484 213.893,189.484 215.915,191.505 215.915,266.119 214.875,267.159 196.615,267.159 196.615,275.851 194.97,277.495 136.55,277.495 124.485,265.43 124.485,246.126 124.485,191.008

## Text inside footprints (layer, text, board x,y; h text height)
GPS1: Bottom Overlay "PA6H" at 41.921,248.73 h1.52 r180; Bottom Overlay "Ultimate GPS / Breakout v3" at 57.669,245.936 h1.2 r270
GPS1_1: Top Overlay "PA6H" at 201.945,249.111 h1.52 r180; Top Overlay "Ultimate GPS / Breakout v3" at 186.197,246.317 h1.2 r90
GPS1_1_1: Top Overlay "PA6H" at 201.564,136.462 h1.52 r180; Top Overlay "Ultimate GPS / Breakout v3" at 185.816,133.668 h1.2 r90
GPS1_2: Bottom Overlay "PA6H" at 41.54,136.081 h1.52 r180; Bottom Overlay "Ultimate GPS / Breakout v3" at 57.288,133.287 h1.2 r270
U5_1: Mechanical 13 "*" at 149.773,223.241 h1.27 r270
U5_1_1: Mechanical 13 "*" at 149.392,110.592 h1.27 r270